# Altium PCB BNC Adapter.PcbDoc
Units mm, origin at the board's own origin, x right, y up, seen from the top; angles counter-clockwise.
Board outline 27 x 15.5 mm, 2 copper layers (Top Layer, Bottom Layer), stack 1 mm thick; 5 components, 3 nets, 13 pads, 0 vias.
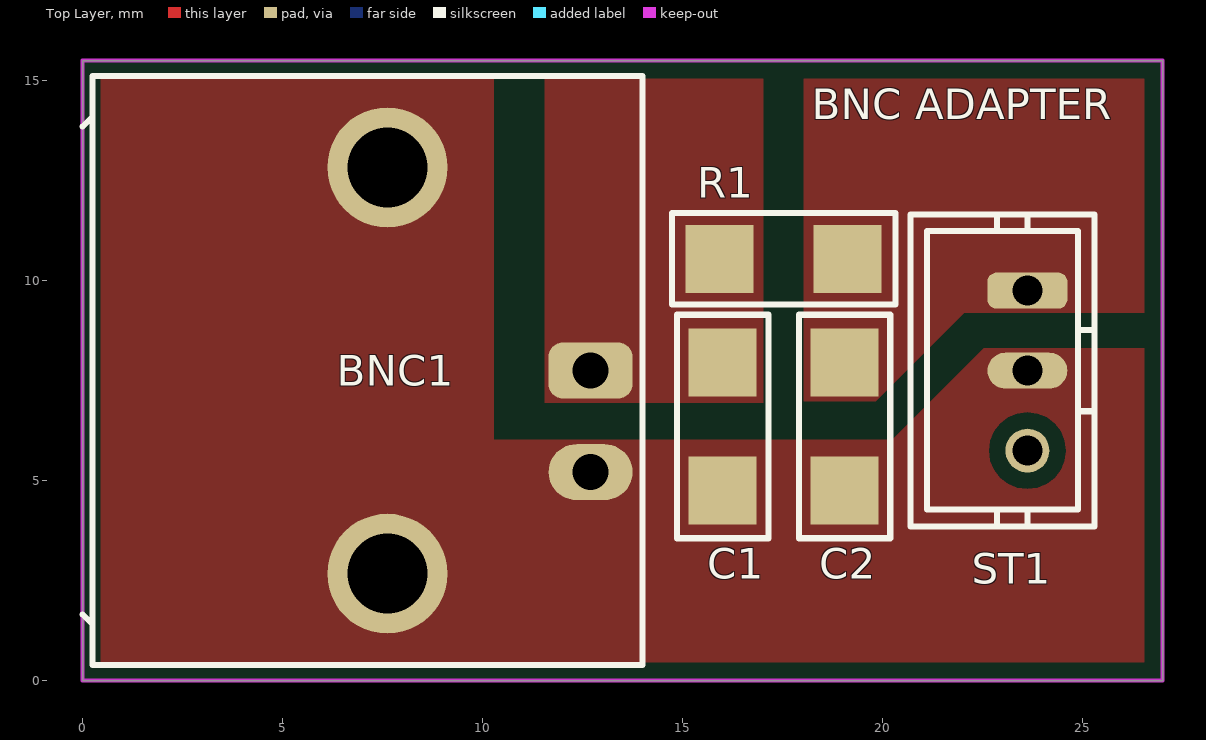
[diagram p0: Top Layer view]
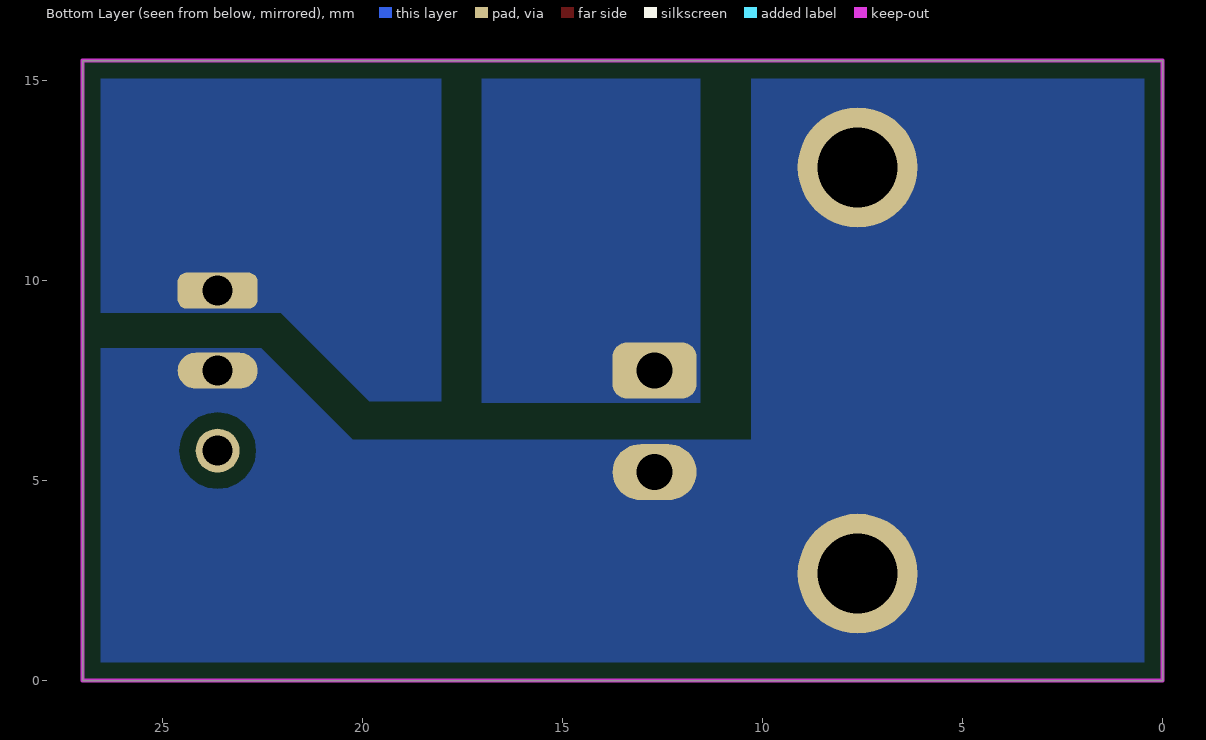
[diagram p1: Bottom Layer view, seen from below]

## Layer stack, top to bottom
Top Solder: solder mask 0.0102, Solder Resist, Dk 3.5
Top Layer: signal copper 0.2
Dielectric1: core 0.6, FR-4, Dk 4.8
Bottom Layer: signal copper 0.2
Bottom Solder: solder mask 0.0102, Solder Resist, Dk 3.5

## Board outline
0,15.5 27,15.5 27,0 0,0

## Design rules (kind name [scope] priority, off if disabled: settings)
Clearance "Clearance Polygon" [(InPolygon) vs (IsComponent OR IsFill OR IsPad OR IsTrack OR IsVia or isarc)] p1: gap=0.4 ignorepadtopadclearanceinfootprint=FALSE except(0: Arc-Hole Track-Hole SMDPad-Hole THPad-Hole Via-Hole Fill-Hole Poly-Hole Region-Hole Text-Hole) // BEAK
Clearance [All] p2: gap=0.2 ignorepadtopadclearanceinfootprint=FALSE except(0: Arc-Hole Track-Hole SMDPad-Hole THPad-Hole Via-Hole Fill-Hole Poly-Hole Region-Hole Text-Hole)
FabricationTestPointUsage TestPointUsage [All] p1: valid=0 allowmultiple=FALSE
FabricationTestpoint Testpoint [All] p1: side=3 testpointundercomponent=TRUE minsize=1.016 maxsize=2.54 preferedsize=1.524 minholesize=0 maxholesize=1.016 preferedholesize=0.813 testpointgrid=0.025 allowsidetop=TRUE allowsidebottom=TRUE usegrid=TRUE gridtolerance=0
Height [All] p1: minheight=0 maxheight=254 prefheight=12.7
HoleSize [All] p1: absolutevalues=TRUE maxlimit=25.4 minlimit=0.025 maxpercent=80.000 minpercent=20.000
MinimumSolderMaskSliver [All] p1: minsoldermaskwidth=0.051
PlaneConnect [All] p1: planeconnectstyle=Direct reliefexpansion=0.508 reliefentries=4 reliefconductorwidth=0.254 reliefairgap=0.254
PolygonConnect [All] p1: connectstyle=Direct reliefconductorwidth=0.254 reliefentries=4 polygonreliefangle="90 Angle" airgapwidth=0.254
RoutingVias [All] p1: holewidth=0.5 width=1 viastyle="Through Hole" minholewidth=0.4 minwidth=0.4 maxholewidth=0.6 maxwidth=2
SilkToSilkClearance [All] p1 off: silktosilkclearance=0.254
SilkToSolderMaskClearance SilkscreenOverComponentPads [IsPad] p1 off: minsilkscreentomaskgap=0.254 clearancetoexposedcopper=TRUE
SolderMaskExpansion [All] p1: expansion=0.102 istentingtop=FALSE
Width [All] p1: maxlimit=5.08 minlimit=0.254 preferedwidth=0.254
22 further rules are at their usual default settings.

## Components (designator, comment, footprint, x,y, rotation, side; value= is the part's Value field where it differs from the comment)
BNC1 "M BNC Buchse liegend PCB gefiltert" "M BNC 456E" 7.62,12.83 r270 top locked
C1 "15p" "C 1206" 16.002,6.35 r90 top
C2 "15p" "C 1206" 19.05,6.35 r90 top
R1 "100R" "R 1206" 17.526,10.541 r0 top
ST1 "M Stiftl B-3B-PH-K-S" "EDV 3481" 23.622,7.747 r90 top

## Footprints (in the part's own frame and the unit in brackets; to place one, negate y for a bottom-side part, rotate by r counter-clockwise, add the part's x,y. Pads: shape width x height; smd on the part's side, far side on the other; paste and mask are expansions set on the pad)
"C 1206" [mm]
  rect 1.7x1.7 smd: 1(-1.6,0) 2(1.6,0)
  silkscreen extent -2.79,-1.14 2.79,1.14, body extent -1.63,-0.84 1.65,0.84, height 0.87
"EDV 3481" [mm] "Steckverbinder"
  rrect50% 0.9x2 hole 0.75: 1(2,0)
  oval 0.9x2 hole 0.75: 2(0,0)
  round 1.1 hole 0.75: 3(-2,0)
  silkscreen extent -3.9,-1.68 3.9,2.92, body extent -3.89,-1.7 3.86,2.9, height 6.08
"M BNC 456E" [mm] "BNC Buchse liegend PCB"
  rrect50% 1.4x2.1 hole 0.9: 1(5.08,5.08)
  round 3 hole 2: 2(0,0) 2(10.16,0)
  oval 1.4x2.1 hole 0.9: 2(7.62,5.08)
  silkscreen extent -2.29,-7.62 12.45,6.38, body extent -3.67,-28.48 13.83,6.07, height 14.15
"R 1206" [mm]
  rect 1.7x1.7 smd: 1(-1.6,0) 2(1.6,0)
  silkscreen extent -2.79,-1.14 2.79,1.14, body extent -1.52,-0.79 1.57,0.79, height 0.6

## Part data
BNC1: "6780"
C1 C2: library part "C 15pF/50V/NP0/1206", "3424"
R1: library part "R 100R/5%/1206", "1545"
ST1: "3481"

## Nets (pads, with @x,y where several pads share a name; then routed paths per layer and width w, separated by ;. In a path a pad name is that pad's centre, name@x,y a point inside that pad or via, vN(x,y) a via of type N, cw(c..) or ccw(c..) an arc to the next point about the centre after c; other vN are vias at no path point)
NetBNC1_1: BNC1.1 C1.2 R1.1
NetBNC1_2: BNC1.2 C1.1 C2.1 ST1.2
NetC2_2: C2.2 R1.2 ST1.1 ST1.3

## Polygon pours and split planes (outlines as drawn)
NetC2_2 on Top Layer "BNC1_1 TOP" (solid, remove dead copper, pour order 1012): 18.034,6.985 18.034,15.497 27,15.497 27,9.193 22.044,9.193 19.836,6.985
NetBNC1_1 on Top Layer "BNC1_1 TOP" (solid, remove dead copper, pour order 1011): 11.557,6.946 11.557,15.5 17.018,15.5 17.018,6.946
NetBNC1_2 on Top Layer "BNC1_2 TOP" (solid, remove dead copper, pour order 1010): 0,0 0,15.5 10.287,15.5 10.287,6.018 20.242,6.018 22.531,8.307 27,8.307 27,0
NetBNC1_2 on Bottom Layer "BNC1_2 TOP" (solid, remove dead copper, pour order 1007): 0,0 0,15.5 10.287,15.5 10.287,6.018 20.242,6.018 22.531,8.307 27,8.307 27,0
NetC2_2 on Bottom Layer "BNC1_1 TOP" (solid, remove dead copper, pour order 1009): 18.034,6.985 18.034,15.497 27,15.497 27,9.193 22.044,9.193 19.836,6.985
NetBNC1_1 on Bottom Layer "BNC1_1 TOP" (solid, remove dead copper, pour order 1008): 11.557,6.946 11.557,15.5 17.018,15.5 17.018,6.946

## Keep-outs
Keep-Out Layer:
  the board outline again, w0.1

## Silkscreen, mask and mechanical layers (free items; w line width, h text height)
Top Overlay:
  text "BNC ADAPTER" at 18.23,14.035 h0.76
Mechanical 1:
  the board outline again, w0.254